# Altium PCB AirBnB-v1.1.PcbDoc (part 7 of 8)
Units mm, origin at the board's own origin, x right, y up, seen from the top; angles counter-clockwise.
Board outline 135.99 x 145 mm, 4 copper layers (Top Layer, Layer 2, Layer 3, Bottom Layer), stack 1.566 mm thick; 343 components, 205 nets, 1123 pads, 557 vias.
Unrouted connection lines stored in the file: 129.
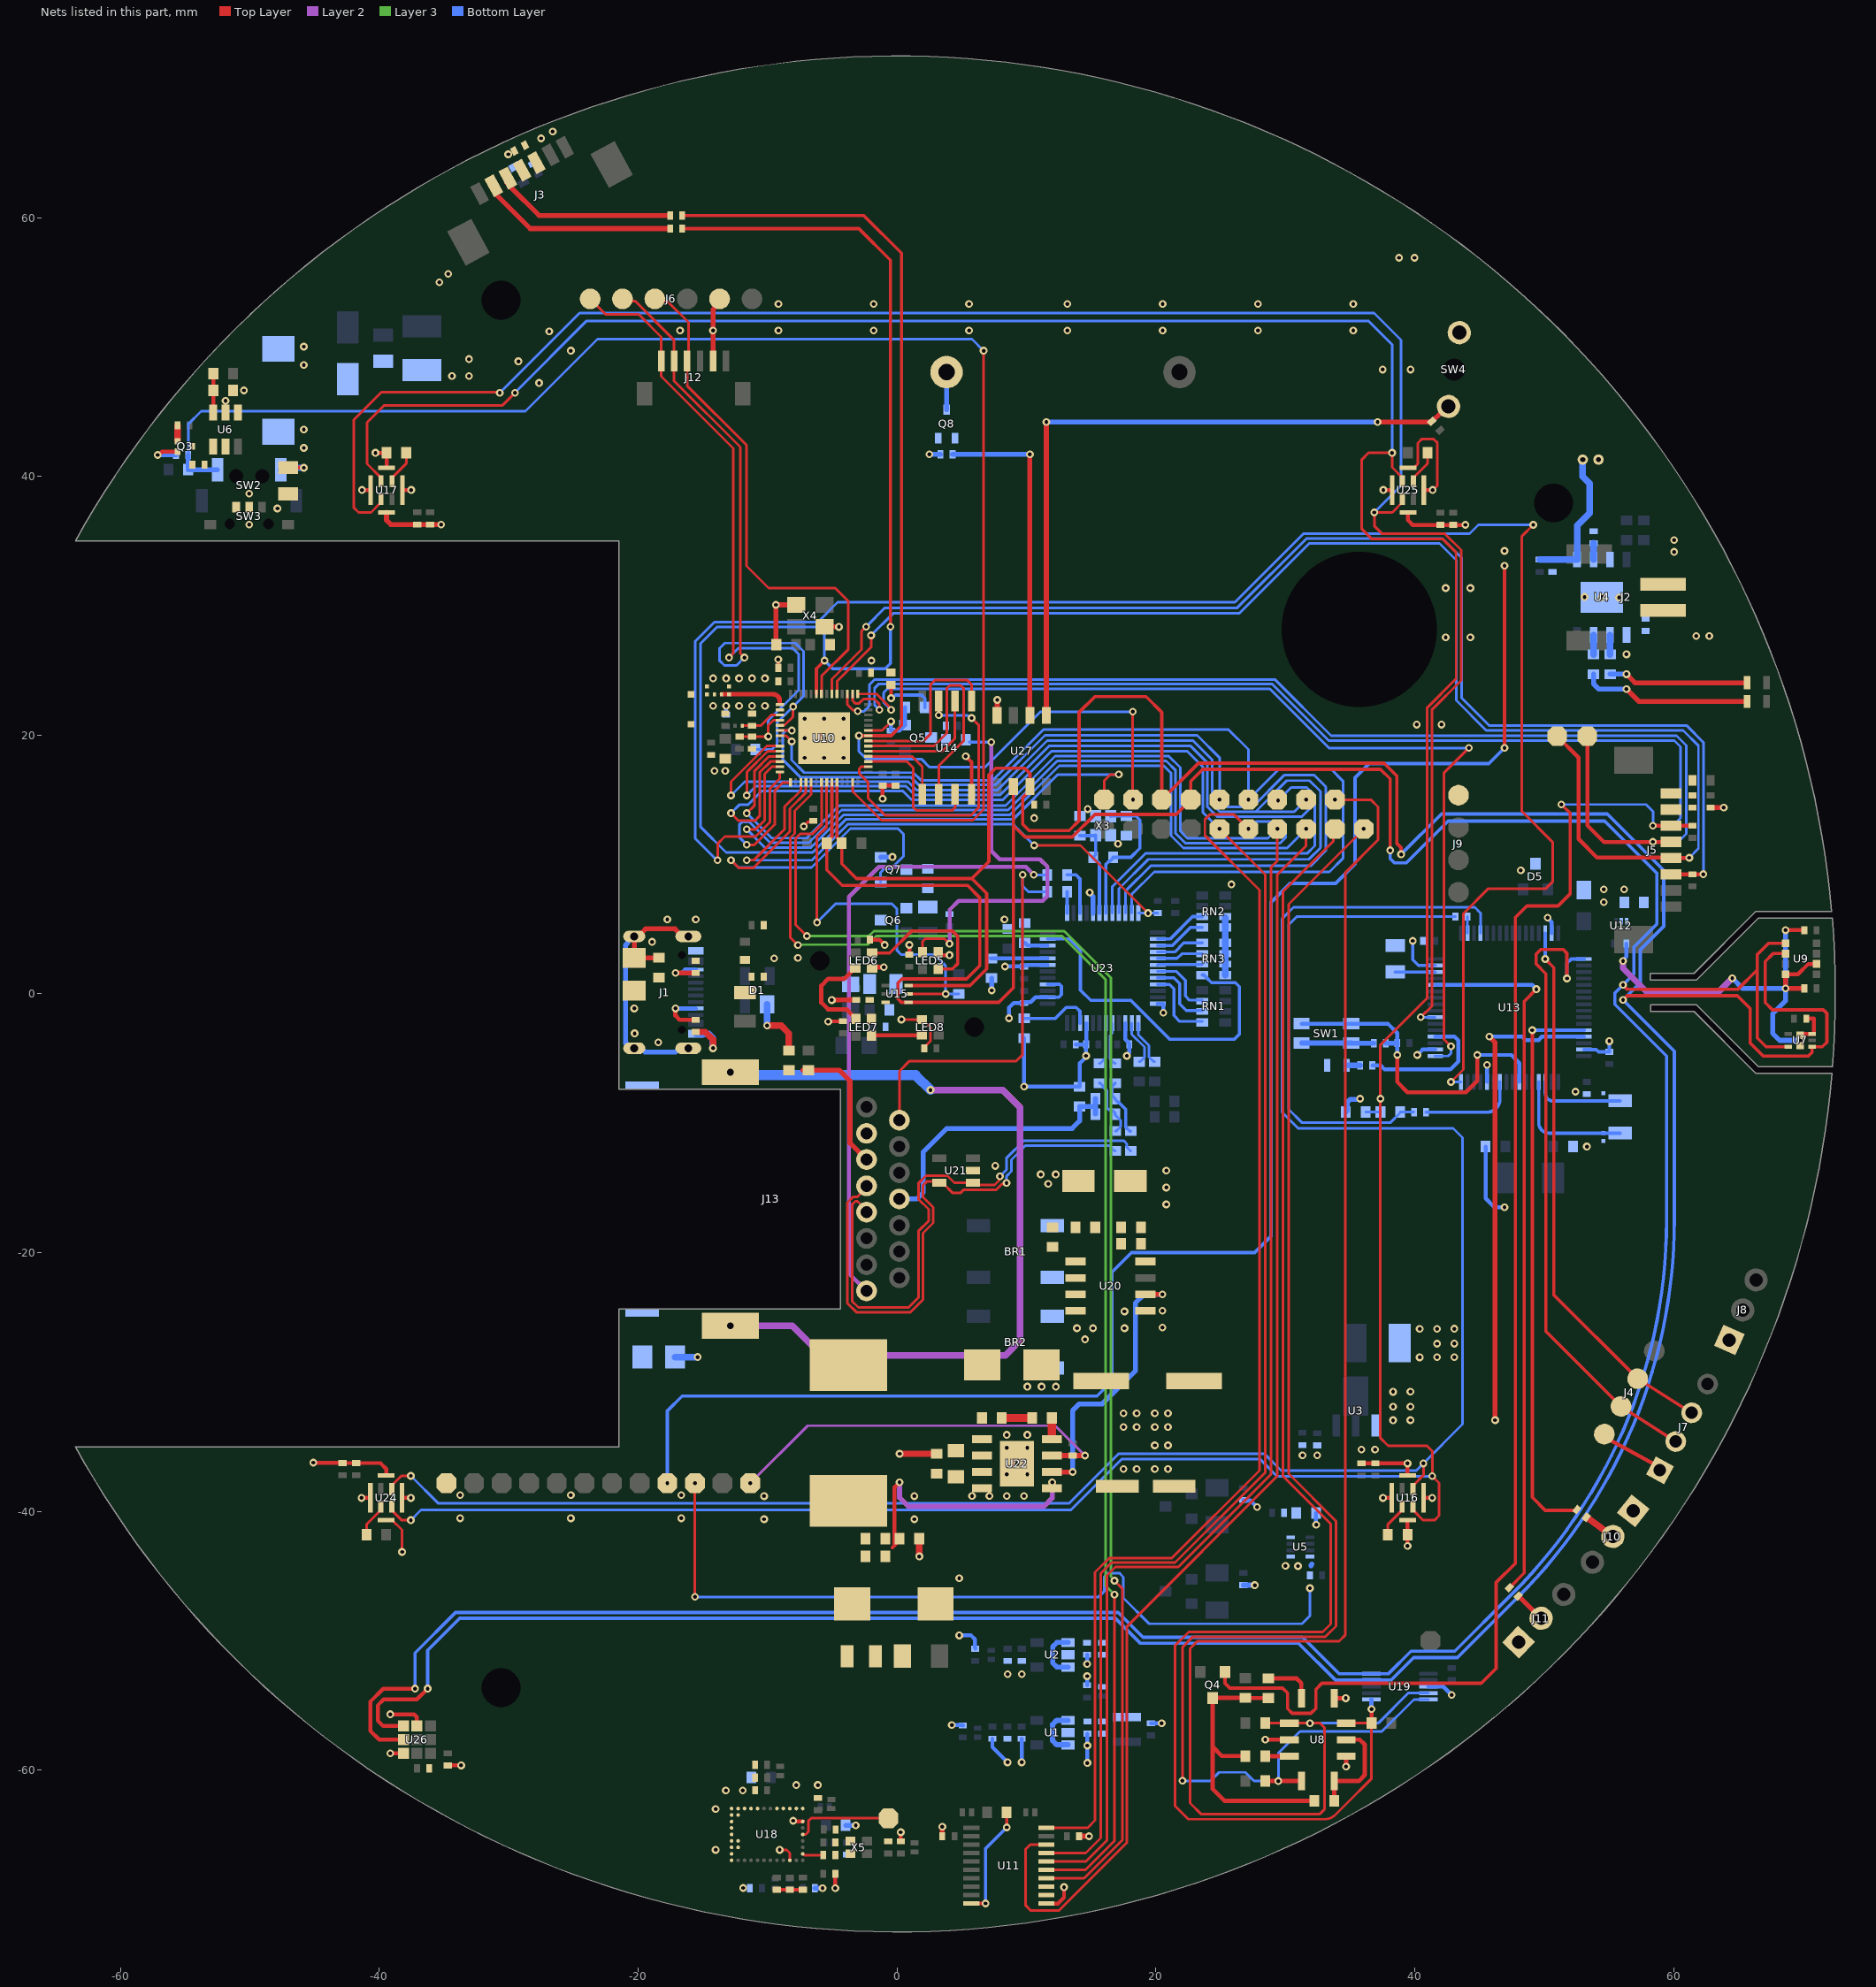
[diagram p5: the nets of this part, all layers, seen from the top]

## Via types
v1: diameter 0.6, hole 0.3, Top Layer to Bottom Layer, 557 vias

## Nets (pads, with @x,y where several pads share a name; then routed paths per layer and width w, separated by ;. In a path a pad name is that pad's centre, name@x,y a point inside that pad or via, vN(x,y) a via of type N, cw(c..) or ccw(c..) an arc to the next point about the centre after c; other vN are vias at no path point) (continued)
B1: P15.1 U10.15 U11.20 | length 159.4
  Top Layer w0.203: v1(-11.613,11.532) -11.019,11.532 -9.461,13.09 -9.461,15.701 -8.826,16.336 U10.15@-8.239,16.336 ; U11.20@11.534,-64.449 14.728,-64.449 15.3,-63.877 15.3,-44.707 16.416,-43.591 21.249,-43.591 28.008,-36.832 28.008,8.037 23.788,12.257 23.788,13.489 24.16,13.861 26.039,13.861 v1(27.15,12.751)
  Bottom Layer w0.203: v1(-11.613,11.532) -12.192,12.11 -12.192,13.072 -11.958,13.306 -11.437,13.306 -9.811,11.68 -6.823,11.68 -4.294,14.209 8.575,14.209 12.375,18.009 20.803,18.009 21.529,17.282 21.529,12.398 22.28,11.647 29.59,11.647 30.038,12.095 30.038,13.053 29.761,13.33 27.728,13.33 v1(27.15,12.751)
B2: P14.1 U10.13 U11.18 | length 159.5
  Top Layer w0.203: v1(-11.613,12.725) -10.929,12.725 -10.234,13.42 -10.234,16.994 -9.669,17.559 -9.066,17.559 U10.13@-9.064,17.561 ; U11.18@11.534,-65.749 10.29,-65.749 9.945,-66.094 9.945,-70.449 10.347,-70.852 12.493,-70.852 17.764,-65.581 17.764,-48.877 29.386,-37.255 29.386,9.219 31.609,11.442 v1(31.609,12.751)
  Bottom Layer w0.203: v1(-11.613,12.725) -10.191,11.303 -6.678,11.303 -4.141,13.839 8.722,13.839 12.521,17.638 20.608,17.638 21.176,17.069 21.176,12.23 22.128,11.278 30.136,11.278 v1(31.609,12.751)
B3: P13.1 U10.12 U11.17 | length 145
  Top Layer w0.203: v1(-12.827,13.97) -12.244,13.387 -10.986,13.387 -10.62,13.753 -10.62,17.114 -9.773,17.961 U10.12@-9.064,17.961 ; U11.17@11.534,-66.399 14.574,-66.399 15.743,-65.23 15.743,-44.788 16.582,-43.949 21.489,-43.949 28.449,-36.988 28.449,9.222 v1(24.92,12.751)
  Bottom Layer w0.203: v1(-12.827,13.97) -12.155,14.642 -11.494,14.642 -10.466,15.67 0.462,15.67 1.133,14.998 8.171,14.998 11.944,18.771 22.409,18.771 23.619,17.561 23.619,14.052 v1(24.92,12.751)
B4: P4.1 U10.11 U11.16 | length 148
  Top Layer w0.203: v1(-11.613,13.97) -11.009,14.575 -11.009,17.242 -9.889,18.361 U10.11@-9.064,18.361 ; U11.16@11.534,-67.049 14.597,-67.049 16.223,-65.423 16.223,-44.935 16.86,-44.297 21.734,-44.297 28.894,-37.138 28.894,9.796 29.387,10.289 P4.1@29.387,12.744
  Bottom Layer w0.203: v1(-11.613,13.97) -11.611,13.97 -9.686,12.045 -6.98,12.045 -4.471,14.554 8.391,14.554 12.222,18.386 20.988,18.386 21.882,17.492 21.882,12.588 22.439,12.031 28.66,12.031 v1(29.379,12.751)
B5: U10.19 U11.15 | length 112
  Top Layer w0.203: v1(-7.663,3.772) -8.244,4.354 -8.244,12.071 -7.906,12.41 -7.906,14.146 -6.639,15.413 U10.19@-6.639,16.336 ; U11.15@11.534,-67.699 14.566,-67.699 16.801,-65.464 v1(16.801,-46.421)
  Layer 3 w0.203: v1(-7.663,3.772) -7.625,3.81 -2.274,3.81 -1.623,4.461 12.76,4.461 16.13,1.091 16.13,-43.348 16.13,-45.75 v1(16.801,-46.421)
B6: U10.21 U11.14 | length 112.9
  Top Layer w0.203: v1(-6.976,4.477) -7.839,5.339 -7.839,12.01 -7.469,12.379 -6.523,12.379 -5.839,13.064 U10.21@-5.839,16.336 ; U11.14@11.534,-68.349 11.535,-68.35 13.689,-68.35 ; 13.691,-68.351 13.689,-68.35 ; v1(16.801,-45.351) 17.4,-45.95 17.4,-65.401 14.451,-68.35 13.689,-68.35
  Layer 3 w0.203: v1(-6.976,4.477) -2.183,4.477 -1.799,4.86 12.915,4.86 16.522,1.253 16.522,-45.033 16.801,-45.312 v1(16.801,-45.351)
B7: U11.13
B8: U11.12
BATT: C20.2 C21.2 J2.2 P8.1 SW3.C U4.5 | length 129.6
  Top Layer w0.254: v1(46.939,19.013) v1(46.939,33.096)
  Bottom Layer w0.254: v1(-17.755,-37.821) -17.755,-32.224 -16.612,-31.082 15.456,-31.082 16.603,-29.935 16.603,-21.497 18.11,-19.99 27.635,-19.99 28.894,-18.731 28.894,7.069 30.371,8.546 33.88,8.546 35.382,10.049 35.382,16.705 36.482,17.805 45.732,17.805 v1(46.939,19.013)
  other v1: 56.363,26.251 61.747,27.658 62.763,27.658 46.939,34.239 -50.068,36.277 -47.884,37.522 -50.063,38.668 -35.364,55 -34.686,55.658 38.786,56.896 39.98,56.896
BOOT0: R30.2 U13.60 | length 44
  Top Layer w0.254: v1(49.088,-2.802) 49.088,-35.832 49.088,-38.908 50.088,-39.908 52.47,-39.908 R30.2@52.525,-39.853
  Bottom Layer w0.254: v1(49.088,-2.802) U13.60@53.084,-2.802
BOOT1: R31.2 U13.28 | length 55.1
  Top Layer w0.254: R31.2@47.325,-45.89 48.458,-44.758 48.458,-0.574 v1(49.4,0.368)
  Bottom Layer w0.305: U13.28@41.584,0.698 49.07,0.698 v1(49.4,0.368)
CH2O_5V: C25.2 FB5.1 J3.4
  other v1: -30.05,64.892
CH2O_RX: P33.1 SB6.1 U10.36 | length 89.7
  Top Layer w0.203: v1(18.212,21.819) 18.212,15.031 v1(18.232,15.011)
  Top Layer w0.254: SB6.1@-16.599,60.169 -2.575,60.169 0.341,57.254 0.341,20.763 -0.462,19.961 U10.36@-2.214,19.961 v1(-2.946,19.961)
  Bottom Layer w0.203: v1(-2.946,19.961) -2.946,18.751 -2.356,18.161 1.876,18.161 2.498,17.539 6.807,17.539 11.087,21.819 v1(18.212,21.819)
CH2O_TX: P32.1 SB5.1 U10.51 | length 121.6
  Top Layer w0.203: P32.1@16.002,15.011 16.002,16.464 16.499,16.96 v1(17.135,16.96)
  Top Layer w0.254: SB5.1@-16.599,59.157 -2.957,59.157 -0.508,56.708 v1(-0.508,28.381) ; U10.51@-6.239,23.186 -6.239,25.13 v1(-5.604,25.765)
  Bottom Layer w0.203: v1(-5.604,25.765) -5.604,27.817 -6.166,28.38 -13.894,28.38 -15.176,27.097 -15.176,12.907 -13.201,10.931 -6.52,10.931 -3.964,13.487 8.953,13.487 12.426,16.96 v1(17.135,16.96)
  Bottom Layer w0.254: v1(-5.604,25.765) -4.973,25.134 -0.919,25.134 -0.508,25.545 v1(-0.508,28.381)
CO: P25.1 R22.2 U8.H U19.6 | length 114.7
  Top Layer w0.203: P25.1@33.838,12.751 33.711,12.624 33.711,11.803 29.822,7.914 29.822,-37.274 33.508,-40.96 33.508,-48.69 32.892,-49.306 22.531,-49.306 21.469,-50.369 21.469,-62.745 22.509,-63.785 33.018,-63.785 ccw(c33.018,-62.564) 33.881,-63.427 34.71,-62.599 36.666,-60.643 R22.2@36.666,-56.368 U8.H@34.71,-56.368
  Top Layer w0.33: R22.2@36.666,-56.368 v1@36.666,-55.282
  Bottom Layer w0.33: U19.6@36.654,-54.534 36.66,-54.54 v1(36.66,-55.276)
ESP_EN: C57.2 J6.6 J12.6 R36.1 U10.4 | length 51.3
  Top Layer w0.203: J6.6@-23.715,53.721 -22.523,52.529 -19.962,52.529 -18.223,50.79 J12.6@-18.223,48.913 -18.223,47.733 -12.66,42.171 -12.66,26.32 v1(-12.98,26) ; R36.1@-12.172,19.89 -12.169,19.893 -9.956,19.893 v1(-9.953,19.896) -9.953,20.761 -9.553,21.161 U10.4@-9.064,21.161
  Bottom Layer w0.203: v1(-12.98,26) -12.259,26.721 -8.061,26.721 -7.605,26.265 -7.605,23.482 -9.953,21.134 v1(-9.953,19.896)
FB_5V: R14.2 R15.1 U6.3 | length 3
  Top Layer w0.305: U6.3@-52.842,44.936 -52.832,44.947 R14.2@-52.832,46.65 R15.1@-52.832,47.93
GND: Ant1.GND C1.1 C2.1 C3.1 C4.1 C5.1 C6.1 C7.1 C8.1 C9.1 C10.1 C11.1 C12.1 C13.1 C14.1 C15.1 C16.1 C17.1 C18.1 C19.2 C20.1 C21.1 C22.1 C23.2 C24.1 C25.1 C26.1 C27.1 C28.1 C29.1 C30.1 C31.1 C32.1 C33.1 C34.1 C35.1 C36.1 C37.1 C38.1 C39.1 C40.1 C41.1 C42.2 C43.2 C44.1 C45.1 C46.1 C47.1 C48.1 C49.1 C50.1 C51.1 C52.1 C53.1 C54.1 C55.1 C56.2 C57.1 C58.1 C59.1 C60.1 C61.2 C62.1 C64.2 C67.2 C68.1 C70.1 C72.1 C73.1 C75.2 C76.1 C77.1 C78.1 C79.1 C80.1 C81.1 C82.1 C83.1 C84.1 C85.1 C86.1 C87.1 C88.1 C89.1 C90.1 C91.1 C92.2 C93.2 C94.1 C95.1 C96.1 C97.1 C98.2 C99.2 C100.2 C101.2 C102.1 C103.1 C104.1 C105.1 C106.1 C107.1 C108.1 C109.1 C110.1 C111.1 C112.1 C113.1 C114.1 C115.1 C116.1 C117.1 C118.1 C119.1 C120.1 C121.2 D1.1 D5.3 D7.1 J1.A1/B12 J1.B1/A12 J2.1 J3.5 J4.1 J5.2 J6.2 J7.1 J8.1 J9.1 J10.1 J11.1 J12.2 J13.1 LED3.2 LED4.2 LED5.3 LED6.3 LED7.3 LED8.3 P5.1 Q3.2 Q7.2 Q8.2 R1.1 R2.1 R3.1 R4.2 R7.2 R8.2 R10.1 R14.1 R25.1 R34.2 R35.2 R52.1 R66.1 R67.1 R75.1 RN2.3 RN2.4 RN3.1 RN3.2 RN3.3 RN3.4 RT1.1 SW1.2 SW2.2 SW4.2 U1.2 U2.2 U3.1 U4.3 U4.9 U5.1 U6.2 U7.6 U7.7 U8.B U8.F U8.J U9.1 U9.7 U10.57 U11.11 U12.2 U13.12 U13.18 U13.31 U13.47 U13.63 U14.4 U15.3 U16.5 U17.5 U18.A1 U18.A2 U18.A3 U18.A4 U18.A5 U18.A6 U18.A7 U18.A8 U18.A9 U18.B3 U18.B4 U18.B8 U18.B9 U18.C9 U18.D9 U18.E9 U18.H9 U18.J9 U18.K1 U18.K9 U18.L9 U18.M7 U18.M9 U19.3 U20.5 U21.2 U22.4 U23.3 U23.9 U23.14 U23.16 U23.19 U23.29 U23.48 U24.5 U25.5 U26.3 U26.8 U27.4 X3.2 X3.4 X4.2 X4.4 X5.2 | length 234
  Top Layer w0.203: U24.5@-39.476,-40.676 -39.001,-40.676 -38.251,-41.426 v1(-38.251,-43.124) ; v1(-9.07,-66.155) -8.53,-66.155 -8.285,-66.4 U18.K1@-8.285,-66.961 ; v1(0.334,-1.974) LED8.3@1.924,-1.974 1.974,-1.974 2.575,-2.575 2.575,-3.647 2.104,-4.118 C93.2@2.104,-4.207 ; U8.J@33.78,-54.438 U8.J@33.786,-54.432 ; U25.5@39.952,40.675 40.238,40.961 40.238,42.584 40.527,42.874 41.48,42.874 41.758,42.596 41.758,39.297 v1@41.41,38.95
  Top Layer w0.229: v1(-7.214,12.954) -6.861,13.306 -6.543,13.306 C49.1@-6.467,13.382
  Top Layer w0.254: C107.1@-9.285,-69.231 C106.1@-8.285,-69.231 C101.2@-7.285,-69.231 ; C32.1@-9.179,25.206 v1(-9.179,25.858) ; U16.5@39.45,-40.675 U16.5@39.45,-40.675 ; U25.5@39.477,40.675 U25.5@39.952,40.675 ; v1(41.381,38.95) v1@41.41,38.95
  Top Layer w0.305: v1(-57.136,41.654) -57.056,41.654 -56.794,41.916 Q3.2@-55.607,41.916 ; C21.1@-47.061,40.684 -47.045,40.668 v1(-45.845,40.668) ; v1(-45.11,-36.226) -45.095,-36.241 -42.866,-36.241 C94.1@-42.851,-36.256 -42.849,-36.258 -39.928,-36.258 -39.475,-36.711 -39.475,-37.203 -39.476,-37.205 U24.5@-39.476,-37.226 ; v1(-41.38,-38.951) U24.5@-40.701,-38.951 ; v1(-41.354,38.95) U17.5@-40.675,38.95 ; v1(-40.304,41.82) R35.2@-39.45,41.82 U17.5@-39.45,40.675 ; v1(-39.167,-58.688) U26.3@-38.146,-58.688 ; v1(-39.167,-55.677) -37.312,-55.677 -37.103,-55.885 -37.103,-56.581 U26.8@-37.096,-56.588 ; U24.5@-38.251,-38.951 v1(-37.572,-38.951) ; U17.5@-38.225,38.95 v1(-37.546,38.95) ; C116.1@-34.709,-59.628 v1(-33.68,-59.628) ; v1(-8.026,-63.906) -7.971,-63.961 U18.M7@-7.285,-63.961 ; v1(-5.321,-2.134) -5.306,-2.119 -4.195,-2.119 C92.2@-4.18,-2.104 ; v1(-4.771,-69.111) C105.1@-4.771,-68.011 ; C61.2@-2.104,4.199 -1.372,4.199 v1(-0.957,3.784) ; v1(-1.114,15.083) C51.1@-1.114,16.1 C54.1@-0.123,16.1 ; C99.2@0.286,-65.492 v1(0.286,-64.795) ; C56.2@0.948,3.043 v1(0.948,3.793) ; LED5.3@3.174,3.224 3.174,3.195 3.371,2.998 v1(4.055,2.998) ; v1(5.309,18.361) 5.76,17.91 U14.4@5.76,15.428 ; U27.4@7.725,21.533 U27.4@7.74,21.548 ; U11.11@11.534,-70.299 12.436,-70.299 12.903,-69.831 v1(12.903,-69.037) ; C88.1@35.89,-36.285 C90.1@36.957,-36.285 v1(39.446,-36.285) 39.446,-37.221 U16.5@39.45,-37.225 ; v1(37.546,-38.95) U16.5@38.225,-38.95 ; v1(37.574,38.95) U25.5@38.252,38.95 ; v1@39.451,-42.658 R34.2@39.451,-41.795 ; R34.2@39.451,-41.795 U16.5@39.45,-40.675 ; U25.5@39.477,37.225 39.477,37.21 39.485,37.202 39.485,36.615 39.852,36.247 41.979,36.247 C97.1@41.986,36.255 C95.1@42.977,36.255 v1(43.917,36.255) ; U16.5@40.675,-38.95 v1(41.354,-38.95) ; U25.5@40.702,38.95 v1(41.381,38.95) ; J4.1@54.653,-34.024 54.708,-34.217 54.794,-34.303 58.466,-36.338 J7.1@58.941,-36.816 ; U9.1@68.65,1.518 69.621,1.518 70.421,2.318 U9.7@71.05,2.318 ; v1(68.65,4.928) C28.1@70.11,4.928 ; U7.7@69.784,-3.215 69.911,-3.088 U7.6@70.701,-3.088 70.847,-3.088 70.849,-3.085 70.849,-1.912 70.85,-1.911 C120.1@70.254,-1.911
  Top Layer w0.33: v1(28.449,-57.638) U8.B@30.31,-57.638 ; U8.J@33.786,-54.432 v1(34.672,-54.432) ; v1(34.698,-59.715) 34.698,-58.92 U8.F@34.71,-58.908
  Top Layer w0.381: U17.5@-39.45,37.225 -39.45,36.614 -39.121,36.285 C91.1@-37.07,36.285 -37.055,36.27 C89.1@-36.08,36.27 ; C89.1@-36.08,36.285 -36.072,36.278 -35.237,36.278 v1(-35.23,36.27) ; J12.2@-14.223,48.913 -14.223,52.888 -13.715,53.396 J6.2@-13.715,53.721 ; C53.1@-9.33,27 -9.349,27.019 -9.349,30.053 v1(-9.368,30.072) X4.4@-7.806,30.072 ; X4.2@-5.606,28.372 v1(-4.496,28.372) ; v1(-5.047,-0.472) C87.1@-3.159,-0.472 ; LED6.3@-1.924,1.974 -1.714,2.074 v1(-1.016,2.074) ; C34.1@3.496,-65.099 v1@3.496,-64.291 ; U27.4@7.74,21.548 v1(7.74,22.723) ; C35.1@14.07,-65.099 v1@14.832,-65.099 ; C31.1@62.866,14.402 62.872,14.407 63.877,14.407 v1(63.882,14.402) ; U9.1@68.65,1.518 v1(68.65,0.428) C29.1@70.11,0.428
  Top Layer w0.508: R3.1@-15.559,-2.941 -14.825,-2.941 -14.227,-3.539 v1(-14.227,-4.198) ; v1(-10.048,-2.443) -8.959,-2.443 -8.357,-3.045 C64.2@-8.357,-4.369 ; v1(0.197,-35.542) R52.1@3.041,-35.542 ; v1(1.721,-43.476) R66.1@1.721,-42.094
  Layer 2 w0.508: v1(56.098,2.548) 56.098,1.981 58.01,0.069 63.393,0.069 v1(64.542,1.218)
  Bottom Layer w0.254: U23.14@11.639,-0.255 11.641,-0.257 12.486,-0.257 12.693,-0.049 12.693,0.596 12.545,0.745 U23.16@11.639,0.745 ; v1(39.853,4.098) 39.853,2.646 40.3,2.198 U13.31@41.584,2.198 ; U13.63@53.084,-4.302 54.034,-4.302 54.214,-4.482 C45.1@55.036,-4.482 v1(55.036,-3.652)
  Bottom Layer w0.305: v1(-57.136,41.654) C60.1@-55.714,41.654 ; C27.1@-13.208,21.59 v1(-13.207,22.26) ; C108.1@-3.975,-64.261 C108.1@-3.972,-64.264 ; v1@-3.192,-64.264 v1(-3.19,-64.267) ; v1(4.228,-56.503) 4.243,-56.518 5.065,-56.518 C15.1@5.08,-56.533 ; v1(4.801,-49.581) 5.721,-49.581 6.02,-49.88 6.02,-50.533 6.038,-50.552 C16.1@6.038,-50.609 ; C13.1@7.366,-57.561 7.366,-58.217 v1(8.534,-59.385) ; v1(8.34,2.122) C83.1@9.819,2.122 9.895,2.198 10.115,2.198 10.162,2.245 U23.19@11.639,2.245 ; v1(8.654,-1.878) 8.654,-1.057 9.013,-0.698 C82.1@9.819,-0.698 9.893,-0.623 10.327,-0.623 10.695,-0.255 U23.14@11.639,-0.255 ; v1(9.627,-59.385) C9.1@9.626,-57.561 ; R67.1@9.819,-3.415 v1(9.819,-7.167) 9.822,-7.17 14.108,-7.17 C68.1@14.111,-7.174 14.111,-5.362 14.607,-4.867 v1(14.607,-4.787) C77.1@14.607,-3.898 ; C81.1@13.806,-3.898 C77.1@14.607,-3.898 ; U23.9@14.639,-2.255 14.639,-3.865 C77.1@14.607,-3.898 ; C3.1@14.684,-53.441 v1@14.684,-52.629 ; v1@14.684,-51.867 C7.1@14.684,-51.079 ; v1(14.707,-59.436) C5.1@14.707,-57.176 ; U23.3@17.639,-2.255 17.639,-3.499 17.949,-3.809 C79.1@17.949,-3.898 17.929,-3.918 17.929,-4.537 17.759,-4.707 v1(17.759,-4.787) ; C1.1@19.609,-56.375 19.615,-56.369 20.441,-56.369 v1(20.447,-56.363) ; U23.48@20.139,-0.755 20.568,-0.755 20.576,-0.763 v1@20.576,-1.33 ; R8.2@26.765,-39.12 26.804,-39.16 27.308,-39.16 v1(27.815,-39.666) ; R10.1@32.373,-40.111 32.38,-40.117 32.38,-41.019 v1(32.386,-41.025) ; v1(40.2,-4.716) 40.615,-4.302 U13.18@41.584,-4.302 ; C44.1@45.479,-11.796 45.479,-15.812 46.152,-16.485 v1(46.939,-16.485) ; U13.12@45.584,-6.802 v1(45.584,-5.49) ; v1(50.278,5.887) 50.278,5.865 50.582,5.561 50.582,4.701 U13.47@50.584,4.698 ; v1(56.098,2.548) 56.098,2.627 56.345,2.875 C36.1@56.345,3.889
  Bottom Layer w0.33: U19.3@41.054,-53.534 42.201,-53.534 v1(42.851,-54.184)
  Bottom Layer w0.381: C113.1@-6.345,-69.111 v1(-5.754,-69.112) ; C108.1@-3.972,-64.264 v1@-3.192,-64.264 ; Q7.2@-1.27,10.561 -1.257,10.574 -0.373,10.574 v1(-0.36,10.586) ; v1(2.489,41.705) R25.1@3.353,41.705 ; v1(7.308,0.272) C78.1@7.307,1.22 ; v1(14.882,7.842) 14.882,7.782 15.139,7.525 U23.29@15.139,6.245 ; R4.2@26.765,-45.691 R4.2@26.765,-45.691 27.633,-45.693 v1(27.635,-45.695) ; SW1.2@31.258,-3.795 SW1.2@35.108,-3.795 35.111,-3.798 36.828,-3.798 C37.1@36.831,-3.802 ; C38.1@34.682,-9.132 34.789,-9.025 34.789,-8.368 35.012,-8.145 35.745,-8.145 v1(35.787,-8.103) ; v1(64.542,1.218) 65.332,0.428 v1(68.65,0.428) ; v1(68.65,4.928) v1(68.65,0.428) ; v1(69.784,-3.588) 68.203,-3.588 67.652,-3.038 67.652,-1.538 68.65,-0.54 v1(68.65,0.428)
  Bottom Layer w0.508: SW2.2@-47.613,40.519 -47.465,40.668 v1(-45.845,40.668) ; C62.1@-17.149,-28.067 v1(-15.414,-28.066) ; J1.A1/B12@-15.53,-3.099 -14.543,-3.099 -14.245,-3.397 -14.245,-4.181 v1(-14.227,-4.198) ; v1(-10.048,-2.443) D1.1@-10.048,-0.806 ; RN3.4@25.355,1.466 RN3.3@25.355,2.306 RN3.2@25.355,3.106 RN3.1@25.355,3.946 RN2.3@25.355,5.892
  other v1: -11.891,-69.1 -14.021,-66.156 14.832,-65.099 3.496,-64.367 -14.021,-62.992 -13.233,-61.565 -11.927,-61.565 -7.785,-61.143 -6.124,-61.143 14.707,-58.095 14.684,-52.73 8.54,-52.579 9.633,-52.579 14.684,-51.79 4.801,-45.161 30.019,-44.209 30.981,-44.218 39.45,-42.658 -10.271,-40.598 1.334,-40.598 -33.755,-40.522 -25.206,-40.522 -16.672,-40.522 -10.271,-38.817 1.334,-38.817 5.793,-38.799 7.133,-38.799 8.473,-38.799 9.813,-38.799 -33.755,-38.741 -25.206,-38.741 -16.672,-38.741 19.915,-36.717 20.93,-36.717 31.327,-35.664 32.463,-35.664 35.89,-35.212 36.933,-35.212 19.915,-34.894 20.93,-34.894 19.915,-33.477 20.93,-33.477 38.324,-32.949 39.666,-32.946 19.915,-32.411 20.93,-32.411 38.324,-31.899 39.666,-31.896 38.324,-30.749 39.666,-30.746 10.063,-30.354 11.165,-30.354 12.268,-30.354 40.382,-28.083 41.724,-28.08 43.066,-28.077 41.724,-27.03 43.066,-27.027 40.382,-25.883 41.724,-25.88 43.066,-25.877 17.577,-25.836 20.508,-25.791 17.577,-24.536 20.508,-24.49 7.585,-13.285 53.3,-11.796 52.418,-7.555 -18.45,-3.748 -20.277,-3.046 20.576,-1.457 -20.307,-1.123 -9.498,2.747 -7.663,2.789 -18.936,4.026 -17.755,5.765 -15.559,5.765 8.296,5.76 54.617,7.09 54.617,8.084 56.19,8.084 25.831,8.467 48.197,9.548 17.069,11.608 10.596,13.596 14.729,14.29 -14.118,17.242 -13.277,17.242 -7.149,18.251 -5.639,18.251 -4.129,18.251 -7.149,19.761 -5.639,19.761 -4.129,19.761 40.163,20.818 42.07,20.818 -7.149,21.271 -5.639,21.271 -4.129,21.271 -14.207,22.26 -12.207,22.26 -11.207,22.26 -10.207,22.26 -14.207,24.394 -13.207,24.394 -12.207,24.394 -11.207,24.394 -10.207,24.394 -1.977,25.765 42.393,27.555 44.3,27.555 55.788,30.632 54.458,30.658 53.127,30.683 42.393,31.369 44.3,31.369 60.038,34.166 60.038,35.077 -51.892,45.847 -50.47,46.65 -27.661,47.219 -34.392,47.758 -33.071,47.758 37.518,48.26 39.682,48.26 -29.261,48.895 -33.071,49.064 -25.21,49.713 -26.876,51.203 -16.764,51.283 -14.223,51.283 -9.169,51.283 -1.803,51.283 5.563,51.283 13.157,51.283 20.523,51.283 27.889,51.283 35.255,51.283 -9.169,53.333 -1.803,53.333 5.563,53.333 13.157,53.333 20.523,53.333 27.889,53.333 35.255,53.333 -27.511,66.127 -26.61,66.65
GPIO9: U10.14 U13.16 | length 147.4
  Top Layer w0.203: v1(-13.868,10.338) -13.868,11.599 -13.306,12.161 -10.937,12.161 -9.839,13.259 -9.839,15.863 -9.064,16.638 U10.14@-9.064,17.161 ; v1(42.801,-6.802) 43.756,-5.847 43.756,6.203 45.698,8.145 50.132,8.145 50.655,8.668 50.655,11.736 48.285,14.105 48.285,35.379 v1(49.161,36.255)
  Bottom Layer w0.203: v1(-13.868,10.338) -13.919,10.338 -15.595,12.014 -15.595,27.26 -14.107,28.748 -6.123,28.748 -4.597,30.274 26.108,30.274 31.408,35.573 44.233,35.573 44.915,36.255 v1(49.161,36.255) ; v1(42.801,-6.802) U13.16@43.584,-6.802
GPIO12: R68.2 U10.17 U23.36 | length 44.6
  Top Layer w0.203: v1(-11.613,10.338) -11.077,10.338 -8.688,12.727 -8.688,14.467 -7.439,15.716 U10.17@-7.439,16.336 ; v1(10.596,11.481) 14.16,11.481 v1(19.393,6.248)
  Bottom Layer w0.203: v1(-11.613,10.338) -6.576,10.338 -3.782,13.132 8.945,13.132 v1(10.596,11.481) ; U23.36@18.639,6.245 18.643,6.248 v1(19.393,6.248) R68.2@20.142,6.248
GPIO13: Q7.1 U10.18 | length 30
  Top Layer w0.203: v1(-12.827,10.338) -12.217,9.728 -11.116,9.728 -8.288,12.556 -8.288,14.311 -7.039,15.56 U10.18@-7.039,16.336
  Bottom Layer w0.203: v1(-12.827,10.338) -12.265,9.776 -6.606,9.776 -3.605,12.776 0.076,12.776 0.508,12.344 0.508,10.656 -0.462,9.687 -0.982,9.687 -1.27,9.399 Q7.1@-1.27,8.661
GPIO16: R33.2 U10.22 U15.5 | length 31.6
  Top Layer w0.203: v1(-6.187,5.53) -6.187,12.16 -5.439,12.907 U10.22@-5.439,16.336 ; U15.5@0.9,0 v1(3.759,0)
  Bottom Layer w0.203: v1(-6.187,5.53) -4.753,6.964 -0.41,6.964 -0.003,6.558 -0.003,3.358 0.314,3.041 2.885,3.041 3.759,2.167 v1(3.759,0) R33.2@4.783,0
GPIO21: C60.2 R40.1 SW2.1 U10.27 | length 117.9
  Top Layer w0.203: U10.27@-3.439,16.336 -3.439,15.65 -1.213,13.424 5.858,13.424 6.689,14.255 v1(6.689,49.713) ; v1@6.647,49.713 v1@6.668,49.692
  Bottom Layer w0.203: C60.2@-54.772,41.657 -54.772,44.035 -53.767,45.04 -28.722,45.04 -23.155,50.607 5.794,50.607 v1(6.689,49.713)
  Bottom Layer w0.381: C60.2@-54.772,41.657 C60.2@-54.775,41.654 R40.1@-54.775,40.519 SW2.1@-52.513,40.519
GPIO38: U10.43 U13.17 | length 77.9
  Top Layer w0.203: U10.43@-3.039,23.186 -1.593,23.186 -0.462,22.055 v1(-0.462,21.96) ; v1(42.801,-4.052) 42.273,-3.523 42.273,17.103 v1(44.183,19.013)
  Bottom Layer w0.203: v1(-0.462,21.96) -1.043,22.541 -1.043,23.286 -0.745,23.583 28.806,23.583 33.376,19.013 v1(44.183,19.013) ; U13.17@41.584,-4.802 42.589,-4.802 42.801,-4.589 v1(42.801,-4.052)
GPIO39: J5.3 Q4.1 R24.1 U10.44 | length 185.7
  Top Layer w0.203: U10.44@-3.439,23.186 -3.439,22.662 -3.239,22.462 -2.935,22.462 -2.598,22.8 -1.758,22.8 -1.365,22.407 v1(-1.364,21.96) v1(-1.364,21.96)
  Top Layer w0.254: Q4.1@25.341,-52.413 25.341,-53.27 25.722,-53.651 29.791,-53.651 30.177,-54.037 30.177,-55.245 30.537,-55.605 31.974,-55.605 32.372,-55.207 32.372,-53.738 32.828,-53.282 45.141,-53.282 46.297,-52.127 46.297,-45.493 47.772,-44.017 47.772,5.916 48.658,6.802 51.066,6.802 52.022,7.758 52.022,13.955 v1(51.333,14.644)
  Top Layer w0.305: Q4.1@25.341,-52.463 Q4.1@25.341,-52.413 ; v1(58.408,13.003) J5.3@59.808,13.003 R24.1@61.466,13.003
  Bottom Layer w0.203: v1(-1.364,21.96) -1.74,22.336 -1.74,23.638 -1.434,23.945 28.997,23.945 33.354,19.588 60.058,19.588 60.542,19.103 60.542,13.591 59.954,13.003 v1(58.408,13.003) 58.408,14.109 57.873,14.644 v1(51.333,14.644)
GPIO40: J5.4 P11.1 U10.45 | length 93.5
  Top Layer w0.203: U10.45@-3.839,23.186 -3.839,22.372 -3.394,21.927 -3.115,21.927 v1(-3.039,21.851)
  Top Layer w0.305: P11.1@53.336,19.921 53.336,13.034 54.617,11.753 v1(58.408,11.753) J5.4@59.808,11.753
  Bottom Layer w0.203: v1(-3.039,21.851) -2.549,21.851 -2.131,22.269 -2.131,23.905 -1.725,24.311 29.186,24.311 33.543,19.954 60.234,19.954 60.985,19.202 60.985,12.373 60.366,11.753 v1(58.408,11.753)
GPIO41: J5.5 P12.1 U10.47 | length 112.1
  Top Layer w0.203: U10.47@-4.639,23.186 -4.639,24.167 -2.007,26.799 v1(-2.007,27.711)
  Top Layer w0.305: P12.1@51.011,19.921 52.656,18.275 52.656,11.977 54.105,10.528 59.783,10.528 59.795,10.515 61.204,10.515 v1(61.216,10.528)
  Bottom Layer w0.203: v1(-2.007,27.711) -0.306,29.412 26.437,29.412 31.844,34.818 41.915,34.818 43.213,33.52 43.213,22.685 45.527,20.371 60.739,20.371 61.925,19.185 61.925,11.237 v1(61.216,10.528)
GPIO42: J5.6 R23.1 U10.48 | length 99.4
  Top Layer w0.203: U10.48@-5.039,23.186 -5.039,24.324 -2.747,26.616 -2.747,28.031 v1(-2.397,28.381)
  Top Layer w0.305: J5.6@59.808,9.253 v1(62.303,9.253)
  Bottom Layer w0.203: v1(-2.397,28.381) -0.933,29.845 26.289,29.845 31.631,35.187 42.15,35.187 43.625,33.712 43.625,22.878 45.748,20.755 60.997,20.755 62.303,19.45 v1(62.303,9.253)
GPIO47: Q5.2 R39.1 R41.2 U10.37 | length 5.4
  Top Layer w0.203: U10.37@-2.214,20.361 -1.164,20.361 v1(-0.468,21.058)
  Bottom Layer w0.305: v1(-0.468,21.058) R41.2@-0.468,20.358 0.163,20.358 0.575,20.77 Q5.2@0.625,20.77 R39.1@0.625,22.151
HTS: Q4.3 R16.1 R17.2 R18.2 R19.2 | length 22.4
  Top Layer w0.33: R17.2@26.916,-54.413 Q4.3@24.391,-54.413 24.391,-58.199 ; R17.2@26.922,-54.419 R19.2@28.7,-54.419 ; R18.2@26.925,-58.903 25.925,-58.903 25.094,-58.903 24.391,-58.199 ; R16.1@32.256,-62.363 25.292,-62.363 24.391,-61.462 24.391,-58.199
IND_LED: R28.1 U13.20 | length 10.6
  Bottom Layer w0.305: R28.1@36.726,-5.522 37.361,-5.522 37.679,-5.839 42.751,-5.839 43.383,-5.208 43.383,-3.609 43.076,-3.302 U13.20@41.584,-3.302
IO0: J6.5 J12.5 R76.1 U10.5 | length 54.2
  Top Layer w0.203: J6.5@-21.215,53.721 -21.037,53.543 -20.237,53.543 -17.223,50.53 -17.223,47.372 -12.118,42.268 -12.118,26.32 v1(-11.799,26) ; U10.5@-9.064,20.761 -9.055,20.77 -8.697,20.77 -8.036,21.431 v1(-8.036,22.204)
  Bottom Layer w0.203: v1(-11.799,26) -12.41,25.388 -13.346,25.388 -13.703,25.746 -13.703,26.729 -13.315,27.117 -7.864,27.117 -7.228,26.482 -7.228,23.012 v1(-8.036,22.204) -9.28,20.96 -9.28,19.284 -9.655,18.91 R76.1@-10.942,18.91
LED_DIN: LED5.4 R43.2 | length 31
  Top Layer w0.203: LED5.4@1.974,3.224 1.974,4.057 2.186,4.269 3.665,4.269 v1(4.055,3.879)
  Layer 2 w0.305: v1(4.055,3.879) 4.055,6.496 4.743,7.184 11.245,7.184 11.632,7.571 11.632,9.827 11.05,10.409 7.925,10.409 7.284,11.05 v1(7.284,19.456)
  Bottom Layer w0.254: R43.2@5.624,19.456 v1(7.284,19.456)
MIC_CLK: C38.2 R29.2 U16.3 U17.3 U24.3 U25.3 | length 284
  Top Layer w0.203: U17.3@-39.875,39.625 -39.875,39.9 -40.951,40.976 -40.951,44.161 -39.614,45.498 -30.487,45.498 v1(-29.531,46.454) ; U24.3@-39.051,-39.626 -39.051,-39.901 -38.276,-40.676 v1(-37.572,-40.676) ; U25.3@39.052,39.625 39.052,39.9 38.252,40.7 v1(38.252,41.82) 36.434,41.82 35.916,41.302 35.916,35.927 36.669,35.173 42.14,35.173 43.197,34.116 43.197,24.359 40.968,22.129 40.968,-0.314 37.352,-3.93 v1(37.352,-8.103) 37.352,-34.326 37.951,-34.925 40.947,-34.925 41.354,-35.331 v1(41.354,-37.268) 41.882,-37.796 41.882,-40.327 41.53,-40.679 40.654,-40.679 39.875,-39.9 U16.3@39.875,-39.625
  Bottom Layer w0.203: v1(-37.572,-40.676) -36.779,-39.883 13.44,-39.883 17.385,-35.939 28.017,-35.939 29.347,-37.268 v1(41.354,-37.268) ; v1(-29.531,46.454) -29.531,46.484 -24.015,52 36.442,52 38.252,50.19 v1(38.252,41.82) ; C38.2@36.206,-9.132 R29.2@37.352,-9.132 v1(37.352,-8.103)
MIC_CLK_MCU: R29.1 SB1.2 SB2.2 | length 37.9
  Bottom Layer w0.203: SB2.2@39.943,-9.132 R29.1@38.876,-9.132 38.876,-9.196 38.142,-9.93 31.268,-9.93 30.259,-8.92 30.259,5.348 30.895,5.984 SB1.2@43.145,5.984
MIC_PDM12: U13.36 U16.4 U24.4 | length 159.5
  Top Layer w0.203: U24.4@-39.051,-38.276 -39.051,-38.001 -38.299,-37.249 v1(-37.572,-37.249) ; U16.4@39.875,-38.275 39.875,-38 40.675,-37.2 v1(40.675,-36.285)
  Bottom Layer w0.203: v1(-37.572,-37.249) -35.442,-39.38 13.285,-39.38 17.133,-35.531 28.367,-35.531 29.674,-36.838 40.122,-36.838 v1(40.675,-36.285) 43.701,-33.26 43.701,-11.112 42.977,-10.389 30.996,-10.389 29.763,-9.155 29.763,5.822 30.642,6.701 44.645,6.701 45.084,6.262 U13.36@45.084,4.698
MIC_PDM34: U13.23 U17.4 U25.4 | length 158.9
  Top Layer w0.203: U17.4@-39.875,38.275 -39.875,38 -40.656,37.219 -41.607,37.219 -41.99,37.602 -41.99,44.364 -39.843,46.51 -30.759,46.51 v1(-30.703,46.454) ; U25.4@39.052,38.275 39.052,38 38.27,37.218 v1(36.878,37.218) 36.878,36.166 37.485,35.559 42.329,35.559 43.583,34.306 43.583,24.232 41.345,21.994 41.345,-0.918 v1(40.462,-1.802)
  Bottom Layer w0.203: v1(-30.703,46.454) -24.528,52.629 36.855,52.629 38.947,50.537 38.947,39.287 v1(36.878,37.218) ; v1(40.462,-1.802) U13.23@41.584,-1.802
NetAnt1_ANT#: Ant1.ANT# C118.2 L5.1
NetC4_2: C4.2 C5.2 L1.2 U1.1 U1.3 | length 3.9
  Bottom Layer w0.406: U1.3@13.208,-58.041 12.342,-58.041 12.014,-57.713 12.014,-56.47 12.342,-56.141 U1.1@13.208,-56.141
NetC6_2: C6.2 C7.2 FB1.2 U2.1 U2.3 | length 3.9
  Bottom Layer w0.381: U2.3@13.214,-52.029 12.348,-52.029 12.02,-51.701 12.02,-50.457 12.348,-50.129 U2.1@13.214,-50.129
NetC8_2: C8.2 F1.2 FB2.1
NetC33_2: C33.2 L4.2 U10.2 U10.3 | length 3.2
  Top Layer w0.203: L4.2@-11.967,20.73 C33.2@-11.207,20.731 ; C33.2@-11.44,20.661 C33.2@-11.439,20.662 ; C33.2@-11.207,20.731 -10.544,20.731 -9.714,21.561 U10.3@-9.064,21.561
NetC39_2: C39.2 U12.3
NetC52_2: C52.2 U13.30 | length 3.1
  Bottom Layer w0.229: C52.2@38.495,1.705 C52.2@38.502,1.698
  Bottom Layer w0.254: C52.2@38.502,1.698 U13.30@41.584,1.698
NetC62_2: C62.2 J13.SH1 J13.SH2 J13.SH3 J13.SH4 | length 66.5
  Layer 2 w0.508: J13.SH1@-12.889,-25.65 -8.103,-25.65 -5.825,-27.928 8.361,-27.928 9.507,-26.783 9.507,-8.774 8.157,-7.424 v1(2.585,-7.424)
  Bottom Layer w0.762: J13.SH1@-12.889,-25.65 J13.SH1@-11.689,-25.65 ; J13.SH2@-12.889,-6.05 -12.664,-6.274 1.435,-6.274 v1(2.585,-7.424)
NetC64_1: C64.1 J13.3 R50.1 | length 10.6
  Top Layer w0.381: R50.1@-7.29,-5.893 R50.1@-6.845,-5.893 -5.829,-5.893 -4.468,-5.893 -3.636,-6.725 -3.636,-11.527 J13.3@-2.359,-12.805
NetC65_2: C65.2 R53.2 R61.1 | length 4.5
  Bottom Layer w0.254: R61.1@16.854,-6.895 16.602,-7.148 16.602,-7.837 R53.2@16.854,-8.089 16.854,-8.153 17.108,-8.407 17.163,-8.407 17.661,-8.904 17.661,-10.28 17.985,-10.604 C65.2@18.048,-10.604
NetC66_2: C66.2 R51.2 R62.1 | length 4.8
  Bottom Layer w0.203: C66.2@16.854,-10.604 16.918,-10.604 17.276,-10.246 17.276,-9.767 16.854,-9.346 R51.2@16.854,-9.283
  Bottom Layer w0.229: R62.1@15.635,-6.895 15.699,-6.895 15.965,-7.162 15.965,-7.225 16.208,-7.468 16.208,-8.788 16.372,-8.953 16.588,-8.953 16.854,-9.219 R51.2@16.854,-9.283 R51.2@16.854,-9.346
NetC68_2: C68.2 J13.6 R51.1 R53.1 | length 21.8
  Bottom Layer w0.381: J13.6@0.181,-15.85 1.514,-15.85 2.023,-15.34 2.023,-12.204 3.834,-10.394 13.524,-10.394 14.111,-9.806 C68.2@14.111,-8.698 15.33,-8.698 ; R51.1@15.33,-9.283 15.33,-8.698 ; R53.1@15.33,-8.089 15.33,-8.698
NetC69_1: C69.1 Q6.1 R55.2 R57.1
NetC70_2: C70.2 FB9.1 Q6.3
NetC71_1: C71.1 D7.2 L3.1 U22.1
NetC71_2: C71.2 R60.1 | length 2.4
  Top Layer w0.635: C71.2@8.092,-32.777 R60.1@10.444,-32.777
NetC74_1: C74.1 R65.1 R66.2 U22.5 | length 21
  Top Layer w0.254: -0.36,-42.785 -0.189,-42.614 R66.2@0.191,-42.234
  Top Layer w0.305: -0.189,-42.614 -0.189,-38.124 v1(0.191,-37.744)
  Top Layer w0.508: U22.5@11.968,-38.215 11.989,-38.194 v1(11.989,-37.744)
  Layer 2 w0.381: v1(0.191,-37.744) 0.191,-38.932 0.866,-39.607 11.351,-39.607 11.989,-38.969 v1(11.989,-37.744)
NetC74_2: C74.2 C75.1 F2.1 L3.2 R65.2
NetC76_2: C76.2 U23.22 | length 1.9
  Bottom Layer w0.305: C76.2@9.869,3.951 10.075,3.745 U23.22@11.639,3.745
NetC78_2: C78.2 U23.20 | length 4.4
  Bottom Layer w0.305: C78.2@7.247,2.745 U23.20@11.639,2.745
NetC80_2: C80.2 R70.1 U23.30 X3.1 | length 7.6
  Bottom Layer w0.254: C80.2@14.122,12.23 15.3,12.23 X3.1@15.348,12.279 15.348,10.751 R70.1@15.164,10.566 15.164,10.503 15.418,10.249 15.481,10.249 15.639,10.091 U23.30@15.639,6.245
NetC85_2: C85.2 R70.2 U23.31 X3.3 | length 11.5
  Bottom Layer w0.254: U23.31@16.139,6.245 16.139,10.018 16.37,10.249 16.434,10.249 16.688,10.503 R70.2@16.688,10.566 18.061,10.566 18.758,11.264 18.758,13.455 18.453,13.76 16.529,13.76 X3.3@16.498,13.729
NetC119_2: C119.2 L5.2 U10.1 | length 5
  Top Layer w0.356: L5.2@-13.555,23.161 -9.579,23.161 cw(c-9.579,22.646) -9.064,22.646 U10.1@-9.064,22.436
NetD8_2: D8.2 F2.2
NetJ1_A5: J1.A5 R3.2 | length 3.8
  Top Layer w0.33: v1(-17.126,-1.123) -17.126,-1.672 -16.796,-2.001 R3.2@-15.559,-2.001
  Bottom Layer w0.33: v1(-17.126,-1.123) J1.A5@-15.556,-1.123
NetJ1_B5: J1.B5 R2.2 | length 3.2
  Top Layer w0.356: v1(-17.126,1.626) R2.2@-15.559,1.626
  Bottom Layer w0.33: v1(-17.126,1.626) -16.626,1.626 -16.375,1.877 J1.B5@-15.556,1.877
NetJ3_2: J3.2 SB5.2 | length 14.8
  Top Layer w0.381: J3.2@-30.954,62.093 -30.954,61.757 -28.354,59.157 SB5.2@-17.539,59.157
NetJ3_3: J3.3 SB6.2 | length 13.6
  Top Layer w0.381: J3.3@-30.142,62.696 J3.3@-30.142,63.034 ; J3.3@-29.855,62.352 -27.673,60.169 SB6.2@-17.539,60.169
NetJ10_2: J10.2 R30.1 | length 2.5
  Top Layer w0.508: R30.1@53.26,-40.438 J10.2@55.31,-41.937
NetJ11_2: J11.2 R31.1 | length 2.5
  Top Layer w0.381: R31.1@48.007,-46.537 48.027,-46.537 49.745,-48.256 J11.2@49.768,-48.256
NetJ13_13: J13.13 R48.1 | length 30.7
  Top Layer w0.203: J13.13@0.181,-9.76 0.181,-5.965 0.965,-5.182 9.213,-5.182 9.701,-4.694 v1(9.701,9.208)
  Bottom Layer w0.203: v1(9.701,9.208) 9.701,8.34 10.145,7.896 R48.1@11.615,7.896
NetJ13_15: J13.15 R49.1 | length 47.6
  Layer 2 w0.305: J13.15@-2.359,-22.955 -3.717,-21.597 -3.717,7.493 -1.39,9.819 9.954,9.819 v1(10.565,9.208)
  Bottom Layer w0.203: v1(10.565,9.208) R49.1@11.615,9.208
NetL2_1: L2.1 R12.2 SW3.1 U6.5
  other v1: -45.845,42.205 -45.845,43.626
NetLED1_2: LED1.2 R5.1 | length 10.9
  Top Layer w0.381: v1(56.363,24.714) 57.023,24.054 LED1.2@65.687,24.054
  Bottom Layer w0.381: R5.1@55.093,24.714 v1(56.363,24.714)
NetLED2_2: LED2.2 R6.1 | length 13.2
  Top Layer w0.381: v1(56.363,23.561) 57.317,22.606 LED2.2@65.687,22.606
  Bottom Layer w0.381: R6.1@53.823,24.714 53.823,23.962 54.224,23.561 v1(56.363,23.561)
NetLED3_1: LED3.1 R28.2 | length 1
  Bottom Layer w0.457: LED3.1@34.74,-5.522 R28.2@35.787,-5.522
NetLED4_1: LED4.1 R39.2 | length 4.5
  Top Layer w0.254: v1(-0.462,22.861) LED4.1@-0.462,23.886
  Bottom Layer w0.254: v1(-0.462,22.861) -0.378,22.861 -0.14,23.099 1.89,23.099 2.149,22.84 R39.2@2.149,22.151
NetLED5_2: LED5.2 LED6.4 | length 11.3
  Top Layer w0.254: LED6.4@-1.924,3.174 -1.917,3.167 -0.577,3.167 1.116,4.86 4.298,4.86 4.676,4.482 4.676,2.326 4.273,1.924 LED5.2@3.174,1.924
NetLED6_2: LED6.2 LED7.4 | length 7.7
  Top Layer w0.33: LED6.2@-3.224,1.974 -3.274,1.974 -4.075,1.172 -5.324,1.172 -5.855,0.642 -5.855,-0.675 -5.344,-1.187 -3.91,-1.187 -3.408,-1.689 -3.358,-1.689 -3.174,-1.874 LED7.4@-3.174,-1.924
NetLED7_2: LED7.2 LED8.4 | length 3.9
  Top Layer w0.33: LED7.2@-1.974,-3.224 -1.949,-3.199 1.899,-3.199 LED8.4@1.924,-3.174
NetLS1_1: LS1.1 Q8.3 | length 2.9
  Bottom Layer w0.381: Q8.3@3.823,45.161 LS1.1@3.823,48.058
NetP20_1: P20.1 R56.1 U22.7 | length 31.2
  Top Layer w0.381: U22.7@11.968,-35.675 R56.1@13.57,-35.675 v1(14.531,-35.675)
  Layer 2 w0.203: v1(-11.354,-37.821) -6.904,-33.37 12.227,-33.37 v1(14.531,-35.675)
NetP21_1: P21.1 U18.M5 | length 7.6
  Top Layer w0.203: U18.M5@-7.285,-64.961 -7.284,-64.96 -7.06,-64.96 -6.866,-64.765 -6.866,-63.927 -6.65,-63.711 P21.1@-0.671,-63.711
NetQ3_1: Q3.1 R11.1 | length 1.2
  Top Layer w0.508: Q3.1@-55.607,42.716 R11.1@-55.607,43.942
NetQ3_3: Q3.3 R12.1 U6.4
NetQ5_3: Q5.3 R42.2 R43.1
NetQ7_3: Q7.3 R57.2
NetR5_2: R5.2 U4.6 | length 1.5
  Bottom Layer w0.508: R5.2@55.093,26.238 U4.6@55.093,27.749
NetR6_2: R6.2 U4.7 | length 1.5
  Bottom Layer w0.508: R6.2@53.823,26.238 U4.7@53.823,27.749
NetR7_1: R7.1 U4.2 | length 1.3
  Bottom Layer w0.508: U4.2@53.823,33.566 R7.1@53.823,34.83
NetR9_1: R9.1 R10.2 U5.4
NetR16_2: R16.2 U8.E U8.G | length 8
  Top Layer w0.33: R16.2@33.78,-62.363 U8.E@33.78,-60.838 35.677,-60.838 36.142,-60.373 36.142,-58.018 35.762,-57.638 U8.G@34.71,-57.638
NetR18_1: R18.1 U8.C | length 1.9
  Top Layer w0.33: R18.1@28.449,-58.903 28.452,-58.905 30.307,-58.905 U8.C@30.31,-58.908
NetR19_1: R19.1 U8.K | length 3.9
  Top Layer w0.33: R19.1@28.7,-52.901 30.874,-52.901 31.24,-53.267 U8.K@31.24,-54.438
NetR26_1: R26.1 U11.10 | length 8.8
  Top Layer w0.203: U11.10@5.734,-70.299 U11.10@5.736,-70.297 ; v1@6.829,-70.297 v1(6.831,-70.295)
  Top Layer w0.254: U11.10@5.736,-70.297 v1@6.829,-70.297 ; v1(8.471,-64.415) R26.1@8.471,-63.246
  Bottom Layer w0.254: v1(6.831,-70.295) 6.831,-66.056 v1(8.471,-64.415)
NetR34_1: R34.1 U16.2 | length 2.6
  Top Layer w0.203: R34.1@37.927,-41.795 37.927,-40.998 39.025,-39.9 U16.2@39.025,-39.625
NetR35_1: R35.1 U17.2 | length 2.7
  Top Layer w0.203: U17.2@-39.025,39.625 -39.025,39.9 -37.926,40.999 R35.1@-37.926,41.82
NetR45_2: R45.2 U20.1
NetR46_1: R46.1 U20.3
NetR47_2: R47.2 U20.2
NetR48_2: R48.2 U23.25 | length 1.7
  Bottom Layer w0.254: U23.25@13.139,6.245 R48.2@13.139,7.896
NetR49_2: R49.2 U23.27 | length 3.8
  Bottom Layer w0.254: R49.2@13.139,9.208 13.82,9.208 14.139,8.888 U23.27@14.139,6.245
NetR54_1: R54.1 U22.2 U22.9
  other v1: 8.473,-37.124 10.063,-37.123 9.268,-36.31 8.473,-35.091 10.063,-35.091 8.473,-34.076 10.063,-34.076
NetR60_2: R60.2 U22.8 | length 1.6
  Top Layer w0.635: U22.8@11.968,-34.405 R60.2@11.968,-32.777
NetR61_2: R61.2 U23.5 | length 3.4
  Bottom Layer w0.203: U23.5@16.639,-2.255 16.631,-2.263 16.631,-3.042 16.456,-3.216 16.456,-5.037 16.791,-5.371 R61.2@16.854,-5.371
NetR62_2: R62.2 U23.6 | length 3.4
  Bottom Layer w0.203: R62.2@15.635,-5.371 15.699,-5.371 16.101,-4.969 16.101,-2.294 U23.6@16.139,-2.255
NetR63_2: R63.2 U23.1 | length 3.5
  Bottom Layer w0.203: U23.1@18.639,-2.255 18.639,-3.154 19.47,-3.985 19.47,-4.876 19.839,-5.244 R63.2@19.902,-5.244
NetR64_2: R64.2 U23.2 | length 3.6
  Bottom Layer w0.203: U23.2@18.139,-2.255 18.139,-3.121 19.116,-4.097 19.116,-4.901 18.772,-5.244 R64.2@18.709,-5.244
NetR67_2: R67.2 U23.10 | length 5.7
  Bottom Layer w0.254: R67.2@9.819,-1.891 12.225,-1.891 13.069,-1.048 13.845,-1.048 14.139,-1.342 U23.10@14.139,-2.255
NetR72_1: R72.1 U24.2 | length 2.6
  Top Layer w0.203: R72.1@-41,-41.796 -41,-41 -39.901,-39.901 U24.2@-39.901,-39.626
NetR73_1: R73.1 U25.2 | length 2.6
  Top Layer w0.203: U25.2@39.902,39.625 39.902,39.9 41,40.998 R73.1@41,41.82
NetR74_1: R74.1 R75.2 RT1.2 U4.1 | length 11.3
  Bottom Layer w0.508: R74.1@49.657,33.566 R75.2@50.643,33.566 U4.1@52.553,33.566 52.553,36.199 53.519,37.166 53.519,39.461 52.984,39.996 RT1.2@52.984,41.3
NetRN1_1: RN1.1 U23.45 | length 5.8
  Bottom Layer w0.229: U23.45@20.139,0.745 21.037,0.745 21.386,0.396 21.386,-1.669 21.837,-2.12 RN1.1@23.585,-2.12
NetRN1_2: RN1.2 U23.44 | length 5.4
  Bottom Layer w0.229: U23.44@20.139,1.245 21.388,1.245 21.838,0.795 21.838,-0.781 22.336,-1.28 RN1.2@23.585,-1.28
NetRN1_3: RN1.3 U23.43 | length 5.1
  Bottom Layer w0.229: U23.43@20.139,1.745 21.571,1.745 22.274,1.042 22.274,-0.15 22.606,-0.483 23.583,-0.483 RN1.3@23.585,-0.48
NetRN2_5: RN2.5 U23.39 | length 4
  Bottom Layer w0.254: U23.39@20.139,3.745 21.275,3.745 22.671,5.14 RN2.5@23.585,5.14
NetRN2_6: RN2.6 U23.38 | length 4.2
  Bottom Layer w0.254: U23.38@20.139,4.245 21.095,4.245 22.83,5.98 RN2.6@23.585,5.98
NetRN3_5: RN3.5 U23.23 | length 26.9
  Bottom Layer w0.254: U23.23@11.639,4.245 13.353,4.245 14.172,3.426 14.172,0.293 14.963,-0.498 18.064,-0.498 21.068,-3.503 26.06,-3.503 26.447,-3.117 26.447,0.568 26.142,0.872 24.304,0.872 23.908,1.268 23.71,1.466 RN3.5@23.585,1.466
NetRN3_6: RN3.6 U23.42 | length 3.5
  Bottom Layer w0.229: U23.42@20.139,2.245 20.17,2.275 23.555,2.275 RN3.6@23.585,2.306
NetRN3_7: RN3.7 U23.41 | length 3.6
  Bottom Layer w0.229: U23.41@20.139,2.745 21.633,2.745 21.994,3.106 RN3.7@23.585,3.106
NetRN3_8: RN3.8 U23.40 | length 3.7
  Bottom Layer w0.229: U23.40@20.139,3.245 21.448,3.245 22.15,3.946 RN3.8@23.585,3.946
NetU20_6: U20.6 U22.6 | length 21.4
  Top Layer w0.381: U22.6@11.968,-36.945 v1(13.57,-36.945) ; U20.6@19.192,-23.22 v1(20.508,-23.22)
  Bottom Layer w0.381: v1(13.57,-36.945) 13.57,-32.196 14.067,-31.699 15.85,-31.699 18.407,-29.142 18.407,-23.887 19.074,-23.22 v1(20.508,-23.22)
NH3: P23.1 R21.2 U8.D U19.5 | length 114.6
  Top Layer w0.203: v1(22.056,-60.818) 22.056,-50.49 22.872,-49.674 33.108,-49.674 33.92,-48.862 33.92,-40.747 30.259,-37.086 30.259,6.942 v1(36.068,12.751)
  Top Layer w0.33: R21.2@28.449,-60.833 31.234,-60.833 U8.D@31.24,-60.838
  Bottom Layer w0.203: v1(22.056,-60.818) 24.219,-60.818 24.875,-60.163 26.915,-60.163 27.585,-60.833 v1(29.465,-60.833) 29.465,-58.685 31.14,-57.01 37.461,-57.01 39.937,-54.534 U19.5@41.054,-54.534
NO2: P24.1 R20.2 U8.A U19.4 | length 125
  Top Layer w0.203: R20.2@28.452,-56.365 U8.A@30.307,-56.365 ; U8.A@30.313,-56.365 v1@31.9,-56.365 ; v1(31.902,-56.363) 32.685,-56.363 33.018,-56.696 33.018,-63.025 32.665,-63.378 23.474,-63.378 22.638,-62.542 22.638,-50.598 23.213,-50.023 34.153,-50.023 34.646,-49.53 34.646,9.381 37.166,11.901 37.166,14.452 36.606,15.011 v1(33.838,15.011)
  Top Layer w0.33: R20.2@28.449,-56.363 R20.2@28.452,-56.365 ; U8.A@30.307,-56.365 U8.A@30.31,-56.368 U8.A@30.313,-56.365 ; v1@31.9,-56.365 v1(31.902,-56.363)
  Bottom Layer w0.203: v1(31.902,-56.363) 37.175,-56.363 39.504,-54.034 U19.4@41.054,-54.034
NRST: C37.2 R27.2 SW1.1 U13.7 | length 26.2
  Top Layer w0.305: v1(38.648,-4.716) 38.648,-6.795 39.447,-7.595 43.955,-7.595 44.831,-6.719 v1(44.831,-4.716)
  Bottom Layer w0.305: SW1.1@31.258,-2.295 SW1.1@35.108,-2.295 37.92,-2.295 38.648,-3.022 R27.2@38.648,-3.795 38.648,-3.802 v1(38.648,-4.716) ; v1(44.831,-4.716) 47.46,-4.716 48.084,-5.341 U13.7@48.084,-6.802
  Bottom Layer w0.381: C37.2@37.771,-3.802 R27.2@38.648,-3.802
OS_OT: R71.2 X5.3 | length 0
  Top Layer w0.254: X5.3@-3.864,-66.562 X5.3@-3.863,-66.561
OSC_80M: R71.1 U18.M2 | length 1.6
  Top Layer w0.203: U18.M2@-7.285,-66.461 -7.263,-66.461 -7.162,-66.562 R71.1@-5.711,-66.562
OSCIN: C40.2 U13.3 X1.1 | length 7
  Bottom Layer w0.254: U13.3@50.084,-6.802 50.084,-7.671 ccw(c50.684,-7.671) 50.201,-8.026 ccw(c50.684,-7.671) 50.329,-8.154 ccw(c50.684,-7.671) 50.684,-8.271 C40.2@54.566,-8.271 55.858,-8.271 X1.1@55.869,-8.26
OSCOUT: C46.2 U13.4 X1.2 | length 9.9
  Bottom Layer w0.254: U13.4@49.584,-6.802 49.584,-9.96 ccw(c50.384,-9.96) 50.384,-10.76 C46.2@54.566,-10.76 X1.2@55.869,-10.76
PB13: SB1.1 U13.34 | length 1.3
  Bottom Layer w0.203: U13.34@44.084,4.698 SB1.1@44.084,5.984
PC2: SB2.1 U13.10 | length 7.6
  Bottom Layer w0.254: SB2.1@40.883,-9.132 45.607,-9.132 ccw(c45.607,-8.154) 46.584,-8.154 U13.10@46.584,-6.802
PMS_5V: C30.2 FB6.1 J5.1
POE_PWR_N: BR1.3 BR2.3 C63.1 D6.2 R45.1 R47.1 U20.4
  other v1: 14.52,-26.695 13.901,-25.836 15.138,-25.836 11.678,-14.68 11.099,-13.95 12.257,-13.95
POE_PWR_P: BR1.1 BR2.1 C63.2 C67.1 C121.1 D6.1 R46.2 R52.2 R54.2 U20.8 U22.3
  other v1: 17.498,-36.717 18.515,-36.717 17.498,-33.477 18.515,-33.477 17.498,-32.411 18.515,-32.411 20.805,-16.264 20.805,-14.96 20.805,-13.657
PWR_STAT: P9.1 R13.1 U5.8 U13.61 | length 100.2
  Top Layer w0.203: v1(-15.621,-46.603) v1(-15.621,-37.821)
  Top Layer w0.381: v1(45.771,-3.302) 46.217,-3.748 v1(46.217,-32.944)
  Bottom Layer w0.203: v1(-15.621,-46.603) 15.582,-46.603 16.003,-46.181 16.003,-45.068 16.317,-44.755 17.17,-44.755 17.488,-45.073 17.488,-46.683 19.485,-48.68 31.29,-48.68 31.902,-48.068 v1(31.902,-45.932)
  Bottom Layer w0.305: v1(45.771,-3.302) 48.315,-3.302 48.576,-3.563 49.573,-3.563 49.834,-3.302 U13.61@53.084,-3.302
  Bottom Layer w0.381: 31.992,-44.209 31.992,-44.124 32.047,-44.069
RD_N: C65.1 J13.7 U21.1 | length 43.9
  Top Layer w0.203: J13.7@-2.359,-16.865 -2.359,-16.584 -2.506,-16.584 -3.063,-16.027 -3.232,-16.027 -3.48,-16.275 -3.48,-23.751 -2.996,-24.234 0.893,-24.234 1.65,-23.477 1.65,-18.336 2.438,-17.548 2.438,-16.64 1.65,-15.852 1.65,-14.636 2.24,-14.046 3.88,-14.046 4.434,-14.6 U21.1@5.861,-14.6 6.111,-14.6 6.268,-14.757 7.542,-14.757 7.871,-14.429 7.871,-14.166 v1(7.947,-14.09)
  Bottom Layer w0.203: v1(7.947,-14.09) 8.476,-13.561 8.476,-12.662 9.784,-11.354 17.526,-11.354 17.749,-11.577 17.749,-11.848 18.028,-12.128 C65.1@18.048,-12.128
RD_P: C66.1 J13.5 U21.5 | length 43.8
  Top Layer w0.203: J13.5@-2.359,-14.835 -2.359,-15.115 -2.506,-15.115 -3.063,-15.672 -3.379,-15.672 -3.835,-16.128 -3.835,-23.898 -3.143,-24.59 1.04,-24.59 2.006,-23.625 2.006,-18.483 2.794,-17.695 2.794,-16.493 2.006,-15.705 2.006,-14.784 2.284,-14.506 3.167,-14.506 U21.5@3.261,-14.6 3.511,-14.6 4.301,-15.39 4.893,-15.39 5.154,-15.129 7.674,-15.129 8.122,-14.68 8.385,-14.68 v1(8.461,-14.604)
  Bottom Layer w0.203: v1(8.461,-14.604) 8.476,-14.589 8.476,-14.064 8.831,-13.708 8.831,-12.81 9.931,-11.709 16.393,-11.709 16.512,-11.828 16.512,-11.848 16.791,-12.128 C66.1@16.854,-12.128
RXD: J6.4 J12.4 U10.50 | length 41.1
  Top Layer w0.203: J6.4@-18.715,53.721 -18.527,53.533 -17.747,53.533 -16.116,51.901 -16.116,49.019 J12.4@-16.223,48.913 -16.223,47.013 -11.633,42.424 -11.633,33.088 -9.922,31.376 -4.789,31.376 -3.765,30.352 -3.765,26.646 -5.839,24.573 U10.50@-5.839,23.186
SCL: P34.1 R37.1 U7.3 U9.4 U10.23 U15.4 U19.10 U26.2 U27.6 | length 307.8
  Top Layer w0.254: U10.23@-5.039,16.336 -5.039,12.124 -5.432,11.731 R37.1@-5.432,11.668 -5.432,9.578 -4.236,8.382 5.457,8.382 6.385,7.455 6.385,2.168 5.372,1.156 0.372,1.156 0.071,0.854 0.071,-0.387 0.334,-0.65 U15.4@0.9,-0.65 7.866,-0.65 8.995,0.479 8.995,13.007 ; U27.6@8.995,16.033 8.995,13.007 ; v1(38.1,11.1) 38.1,16.622 37.357,17.365 23.619,17.365 22.691,16.437 P34.1@22.691,15.011 21.56,13.881 15.291,13.881 13.538,12.127 9.875,12.127 8.995,13.007 ; v1(56.098,0.698) 56.446,0.351 64.954,0.351 66.467,1.863 ; U9.4@68.65,3.918 67.335,3.918 66.467,3.05 66.467,1.863 ; U7.3@68.866,-4.088 67.158,-4.088 66.467,-3.396 66.467,1.863
  Top Layer w0.305: U26.2@-38.146,-57.638 -40.015,-57.638 -40.712,-56.941 -40.712,-54.708 -39.7,-53.696 v1(-37.242,-53.696)
  Bottom Layer w0.254: v1(-37.242,-53.696) -37.242,-50.932 -34.12,-47.811 17.092,-47.811 19.01,-49.729 31.333,-49.729 34.138,-52.534 U19.10@36.654,-52.534 37.985,-52.534 39.714,-50.805 43.097,-50.805 47.493,-46.409 ccw(c18.601,-17.516) 59.461,-17.516 ; v1(38.1,11.1) 38.1,10.451 38.426,10.125 39.354,10.125 42.589,13.36 54.686,13.36 58.718,9.328 58.718,5.407 56.933,3.622 56.933,1.534 v1(56.098,0.698) 55.461,0.061 55.461,-0.799 59.461,-4.8 59.461,-17.515
SDA: P35.1 R38.1 U7.4 U9.3 U10.24 U15.6 U19.9 U26.1 U27.7 | length 319.4
  Top Layer w0.254: U10.24@-4.639,16.336 -4.639,12.094 -4.276,11.731 R38.1@-4.276,11.668 -4.276,10.064 -3.137,8.926 5.776,8.926 ; U15.6@0.9,0.65 5.643,0.65 6.926,1.933 6.926,7.776 5.776,8.926 ; v1(38.95,10.79) 38.95,11.308 38.609,11.648 38.609,16.863 37.629,17.843 23.292,17.843 P35.1@20.461,15.011 20.461,21.761 19.235,22.987 15.288,22.987 14.067,21.765 14.067,13.392 13.302,12.627 10.198,12.627 9.701,13.123 9.701,15.169 10.265,15.733 U27.7@10.265,16.033 10.265,17.033 9.854,17.445 7.616,17.445 7.088,16.917 7.088,10.238 5.776,8.926 ; v1(56.098,-0.457) 56.419,-0.136 64.931,-0.136 65.917,-1.122 65.917,-3.789 66.933,-4.804 70.414,-4.804 70.701,-4.516 U7.4@70.701,-4.088 71.5,-4.088 71.85,-3.738 71.85,-1.503 71.571,-1.224 67.645,-1.224 67.081,-0.66 67.081,2.515 67.685,3.118 U9.3@68.65,3.118
  Top Layer w0.305: U26.1@-38.146,-56.588 -39.707,-56.588 -40.132,-56.163 -40.132,-54.991 -39.675,-54.534 -37.109,-54.534 v1(-36.271,-53.696)
  Bottom Layer w0.254: v1(-36.271,-53.696) -36.271,-50.724 -33.802,-48.255 16.87,-48.255 18.807,-50.192 31.035,-50.192 33.876,-53.034 U19.9@36.654,-53.034 38.176,-53.034 39.916,-51.294 43.3,-51.294 47.893,-46.701 ccw(c18.847,-17.46) 60.061,-17.46 60.061,-4.421 v1(56.098,-0.457) 57.428,0.874 57.428,3.41 59.246,5.227 59.246,9.547 54.879,13.914 42.074,13.914 v1(38.95,10.79)
Shell: C2.2 J1.S1 J1.S2 J1.S3 J1.S4 R1.2 | length 23.4
  Top Layer w0.381: R1.2@-18.392,2.794 C2.2@-20.306,2.794 J1.S2@-20.306,4.452 -20.001,4.452 -19.424,5.029 -17.159,5.029 -16.581,4.452 J1.S1@-16.126,4.452
  Bottom Layer w0.381: J1.S2@-19.766,4.452 -20.566,4.452 -20.806,4.212 -20.806,3.952 -20.979,3.779 -20.979,-3.716 -20.966,-3.729 -20.966,-3.798 -20.566,-4.198 -19.766,-4.198 -19.476,-4.488 -17.106,-4.488 -16.817,-4.198 J1.S4@-16.126,-4.198 ; J1.S1@-16.817,4.452 J1.S1@-16.126,4.452
Siren: Q8.1 R25.2 U27.2 | length 26.1
  Top Layer w0.381: U27.2@10.262,21.537 v1(10.262,41.705)
  Bottom Layer w0.381: R25.2@4.293,41.705 v1(10.262,41.705)
SPI2_CS_IO5: P26.1 U10.10 U23.32 | length 82.1
  Top Layer w0.203: v1(-11.613,15.342) -11.613,17.134 -9.986,18.761 U10.10@-9.064,18.761
  Bottom Layer w0.203: v1(-11.613,15.342) -10.908,16.047 0.708,16.047 1.376,15.378 7.964,15.378 11.769,19.183 22.651,19.183 23.986,17.848 23.986,14.453 24.726,13.713 31.295,13.713 32.275,14.693 ; U23.32@16.639,6.245 16.639,8.308 19.183,10.853 31.681,10.853 32.275,11.447 32.275,14.693 ; v1(29.445,14.946) 30.455,15.956 31.668,15.956 32.275,15.348 32.275,14.693
SPI2_MISO_IO1: P28.1 U10.6 U23.34 | length 77.1
  Top Layer w0.203: U10.6@-9.064,20.361 v1(-8.129,20.361)
  Bottom Layer w0.203: v1(-8.129,20.361) -8.584,20.361 -8.847,20.098 -8.847,18.131 -7.474,16.759 1.064,16.759 1.675,16.148 7.581,16.148 11.431,19.998 23.186,19.998 24.92,18.264 v1(24.92,15.011) 25.477,14.455 27.474,14.455 29.945,16.927 32.205,16.927 33.13,16.002 33.13,11.067 31.962,9.899 19.599,9.899 17.639,7.939 U23.34@17.639,6.245
SPI2_MOSI_IO2: P29.1 U10.7 U23.35 | length 78.2
  Top Layer w0.203: U10.7@-9.064,19.961 -9.055,19.953 -8.581,19.953 v1(-8.142,19.514)
  Bottom Layer w0.203: v1(-8.142,19.514) -8.142,18.075 -7.17,17.103 1.257,17.103 1.841,16.52 7.396,16.52 11.301,20.425 25.614,20.425 27.15,18.889 v1(27.15,15.011) 29.492,17.353 33.553,17.353 34.451,16.456 34.451,10.482 33.408,9.439 19.87,9.439 18.139,7.709 U23.35@18.139,6.245
SPI2_SCK_IO4: P27.1 U10.9 U23.33 | length 86.9
  Top Layer w0.203: v1(-12.827,15.342) -12.827,16.407 -10.069,19.166 -9.068,19.166 U10.9@-9.064,19.161
  Bottom Layer w0.203: v1(-12.827,15.342) -11.764,16.405 0.858,16.405 1.511,15.751 7.764,15.751 11.601,19.588 22.869,19.588 24.357,18.101 24.357,14.662 24.935,14.084 27.7,14.084 ; U23.33@17.139,6.245 17.139,8.133 19.412,10.405 31.822,10.405 32.716,11.3 32.716,15.646 31.874,16.489 30.105,16.489 27.7,14.084 ; v1(31.609,15.011) 30.682,14.084 27.7,14.084
SPICLK: U10.33 U14.6 | length 10
  Top Layer w0.203: U10.33@-2.214,18.761 3.486,18.761 4.474,19.749 4.474,22.622 U14.6@4.49,22.638
SPICS0: U10.32 U14.1 | length 6.6
  Top Layer w0.203: U10.32@-2.214,18.361 1.153,18.361 1.95,17.565 U14.1@1.95,15.428
SPID: U10.35 U14.5 | length 13.6
  Top Layer w0.203: U10.35@-2.214,19.561 2.057,19.561 2.569,20.074 2.569,23.894 2.949,24.274 5.397,24.274 5.76,23.911 U14.5@5.76,22.638
SPIHD: U10.30 U14.7 | length 23.6
  Top Layer w0.203: U10.30@-2.214,17.561 -2.78,17.561 -2.927,17.414 -2.927,17.04 -2.247,16.36 -2.247,15.142 -0.898,13.793 5.689,13.793 6.318,14.421 6.318,20.763 v1(5.76,21.321) ; U14.7@3.22,22.638 3.223,22.635 3.223,21.542 v1(3.226,21.539)
  Bottom Layer w0.203: v1(3.226,21.539) 5.434,21.539 5.652,21.321 v1(5.76,21.321)
SPIQ: U10.34 U14.2 | length 20.4
  Top Layer w0.203: U10.34@-2.214,19.161 2.853,19.161 3.855,20.163 3.855,23.622 4.087,23.854 4.912,23.854 5.135,23.632 5.135,19.546 3.22,17.631 U14.2@3.22,15.428
SPIWP: U10.31 U14.3 | length 11.2
  Top Layer w0.203: U10.31@-2.214,17.961 0.765,17.961 1.25,17.476 1.25,14.428 1.482,14.196 4.28,14.196 4.49,14.406 U14.3@4.49,15.428
SW_5V: D4.2 L2.2 U6.1
  other v1: -45.845,48.605 -45.845,50.026
SWCLK: J4.2 J7.2 U13.49 | length 49.9
  Top Layer w0.254: v1(51.765,1.198) 51.765,3.153 51.479,3.439 49.743,3.439 49.392,3.088 49.392,2.302 50.142,1.552 50.142,-26.083 J4.2@55.941,-31.881 J7.2@60.173,-34.595
  Bottom Layer w0.254: v1(51.765,1.198) 51.765,2.37 52.093,2.698 U13.49@53.084,2.698
SWDIO: J4.3 J7.3 U13.46 | length 42.3
  Top Layer w0.254: v1(50.084,2.698) 50.757,2.026 50.757,-23.267 J4.3@57.228,-29.738 J7.3@61.404,-32.373
  Bottom Layer w0.254: v1(50.084,2.698) U13.46@50.084,4.698
Tamper_Sw: R32.1 SW4.1 U27.1 | length 54.2
  Top Layer w0.381: U27.1@11.535,21.533 v1(11.535,44.201) ; v1(37.135,44.201) 41.17,44.201 41.187,44.184 41.256,44.184 R32.1@41.317,44.245 ; R32.1@41.319,44.245 41.411,44.33 42.569,45.41 SW4.1@42.61,45.409
  Bottom Layer w0.381: v1(11.535,44.201) v1(37.135,44.201)